# EAGLE board milling_cutout (EAGLE 9.6.2)

Size 20 x 20 mm. Coordinates in mm from the lower left corner, seen from the top.
Outline: 0,0 20,0 20,20 0,20 0,0
Copper layers used: 
Milling: 5 lines

## Footprints (pad centres in the part's own frame; a part is rotated, then mirrored left to right if it is on the bottom)
MILLING-CUTOUT = smd 1 x 1: 1 3,0

## Placement (x,y rotation side)
CUTOUT1  [MILLING-CUTOUT]  10,10 0 top

## Library data of the parts
CUTOUT1 = cutout-test